# Altium PCB PCB_Autolog.PcbDoc (part 1 of 2)
Units mil, origin at the board's own origin, x right, y up, seen from the top; angles counter-clockwise.
Board outline 3847.36 x 2641.73 mil, 2 copper layers (Top Layer, Bottom Layer); 80 components, 62 nets, 278 pads, 180 vias.
Unrouted connection lines stored in the file: 64.
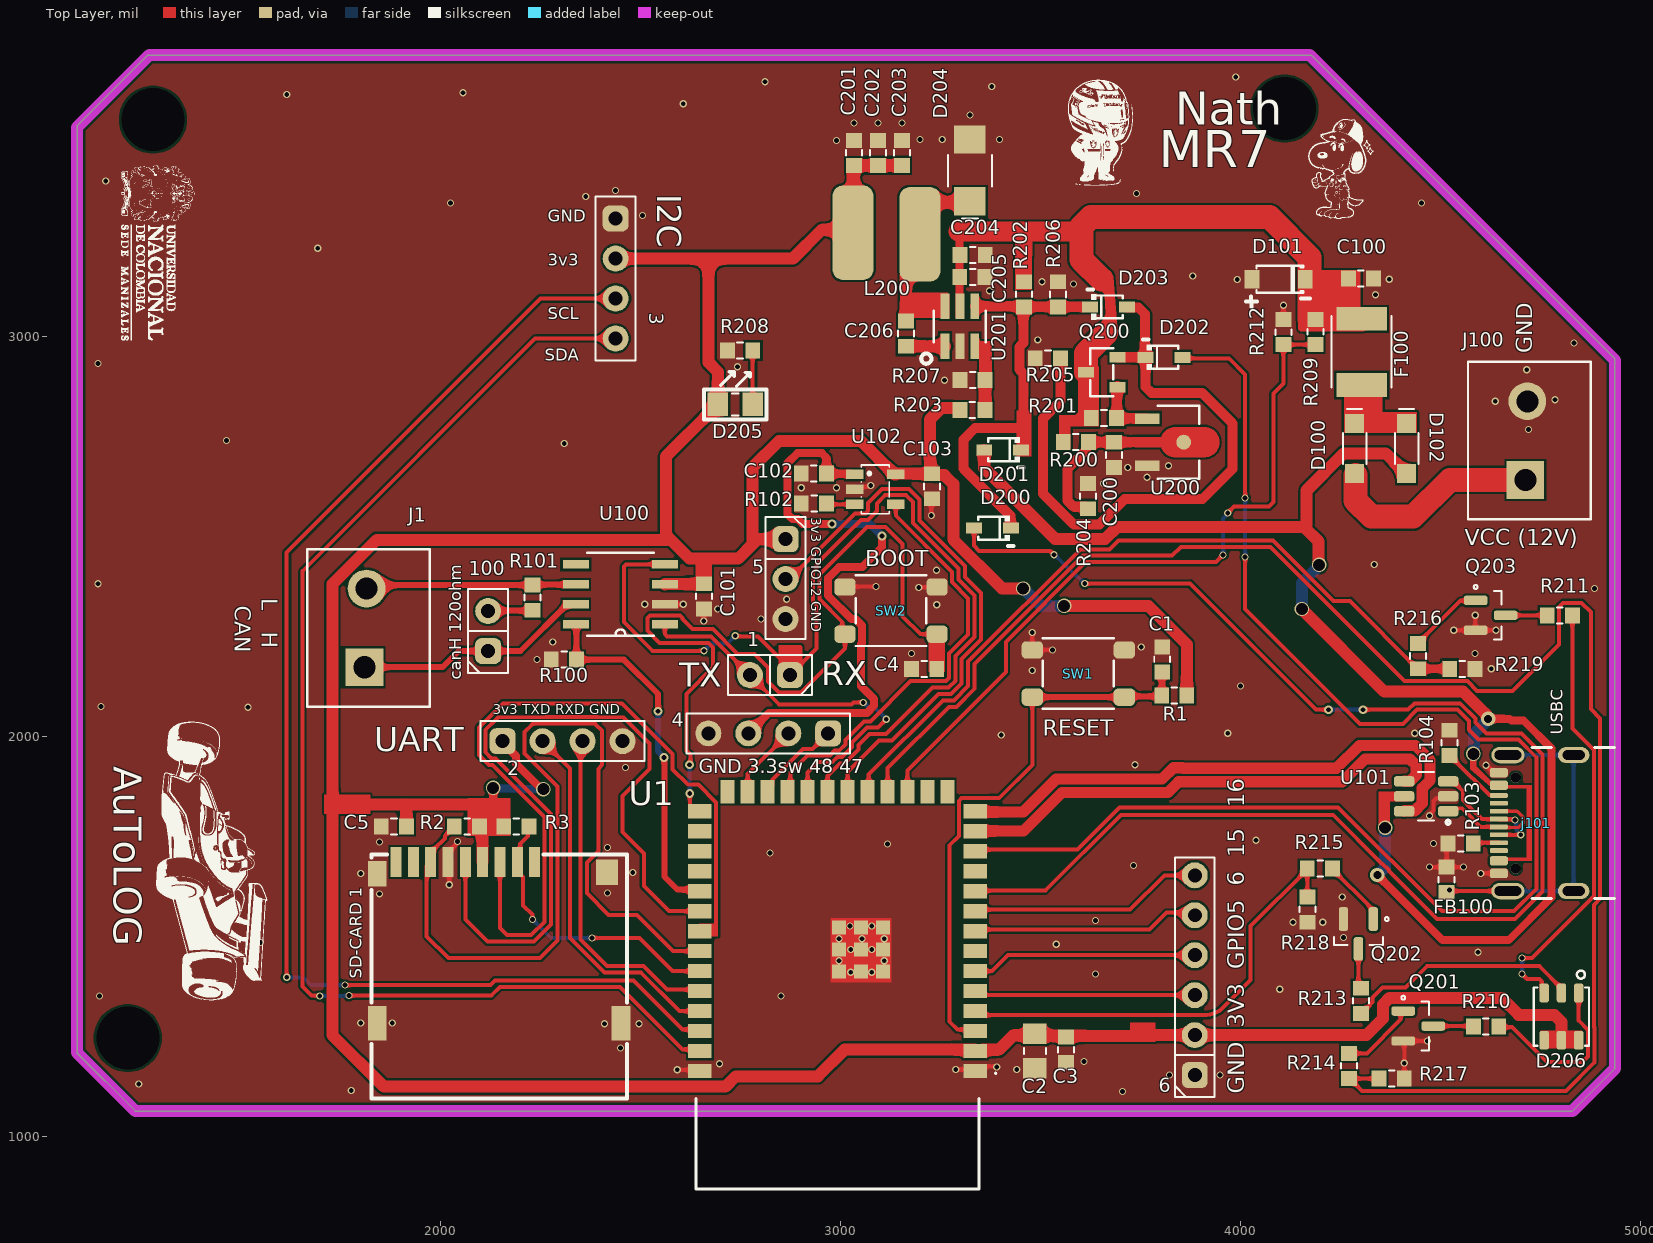
[diagram p0: Top Layer view]
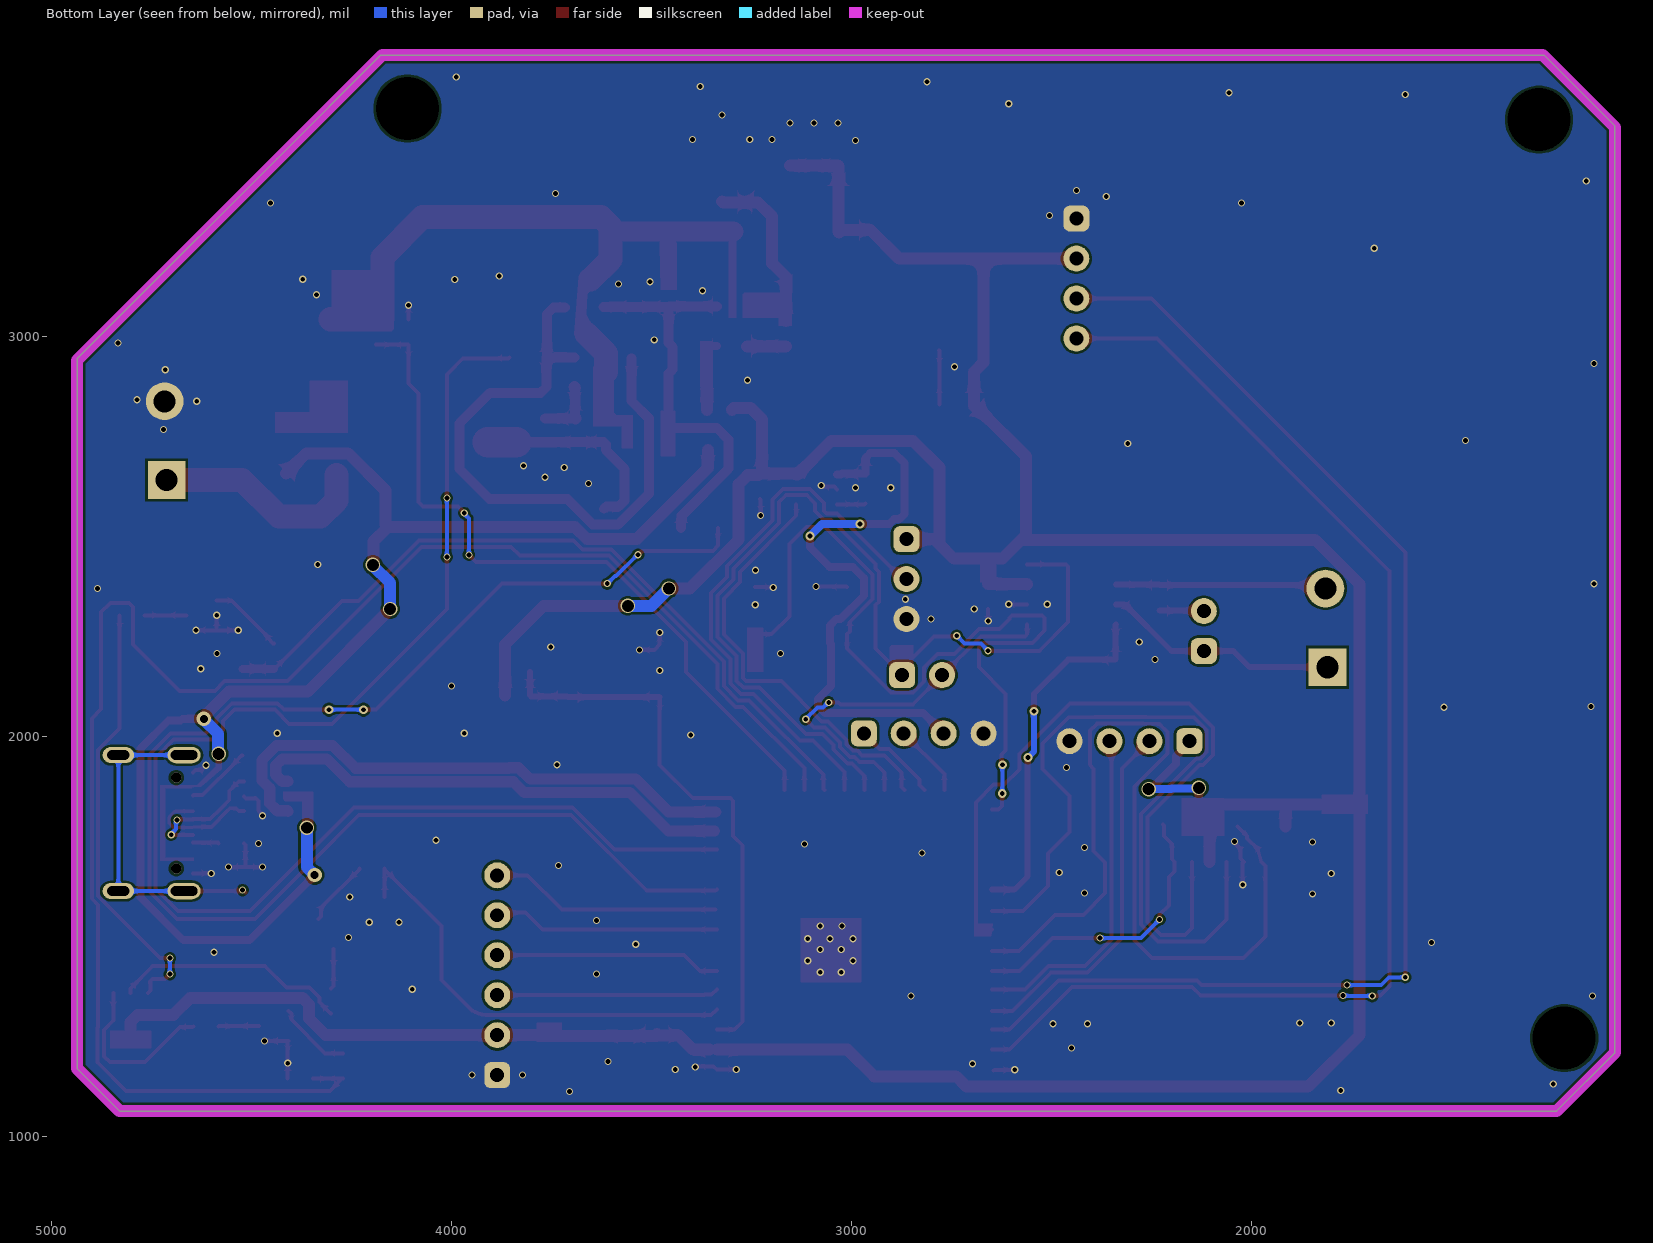
[diagram p1: Bottom Layer view, seen from below]
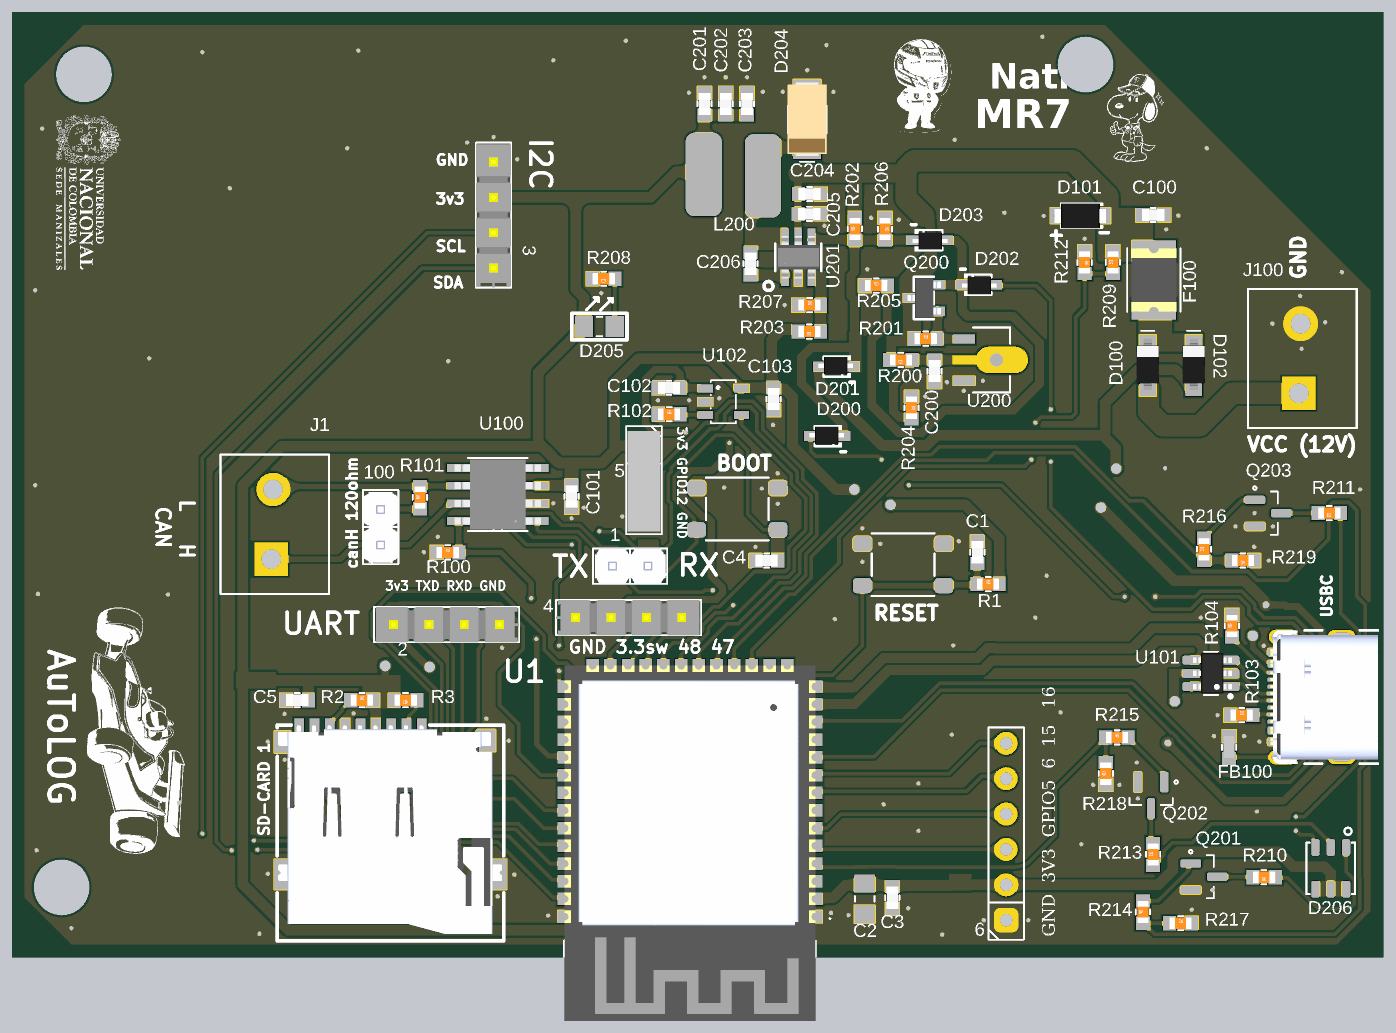
[diagram p3: 3D render of the assembled board from above, using the file's embedded part models]

## Layer stack, top to bottom
Top Solder: solder mask 0.4, Solder Resist, Dk 3.5
Top Layer: signal copper 1.4
Dielectric 1: dielectric 12.6, FR-4, Dk 4.8
Bottom Layer: signal copper 1.4
Bottom Solder: solder mask 0.4, Solder Resist, Dk 3.5

## Board outline
1089.65,1209.01 1235.67,1062.99 4830.71,1062.99 4937.01,1169.29 4937.01,2944.88 4826.77,3055.12 4437.01,3444.88 4177.17,3704.72 1266.95,3704.72 1089.65,3527.42

## Design rules (kind name [scope] priority, off if disabled: settings)
Clearance Clearance_1 [All] p1: gap=6 ignorepadtopadclearanceinfootprint=FALSE
Clearance Clearance_Vias [isvia] p2: gap=0 ignorepadtopadclearanceinfootprint=FALSE
DiffPairsRouting [All] p1: maxlimit=6 minlimit=6 mostfreqgap=6 toplayer_minwidth=10 toplayer_maxwidth=28 toplayer_prefwidth=28 bottomlayer_minwidth=10 bottomlayer_maxwidth=28 bottomlayer_prefwidth=28 maxuncoupledlength=500
HoleSize [All] p1: absolutevalues=TRUE maxlimit=200 minlimit=12 maxpercent=80.000 minpercent=20.000
MinimumAnnularRing [All] p1: minimumring=3
MinimumSolderMaskSliver [All] p1: minsoldermaskwidth=4
PlaneConnect [All] p1: planeconnectstyle=Direct reliefexpansion=20 reliefentries=4 reliefconductorwidth=10 reliefairgap=10
PolygonConnect [All] p1: connectstyle=Direct reliefconductorwidth=8 reliefentries=4 polygonreliefangle="90 Angle" airgapwidth=6
RoutingVias [All] p1: holewidth=12 width=22 viastyle="Through Hole" minholewidth=12 minwidth=18 maxholewidth=30 maxwidth=40
SilkToSilkClearance [All] p1: silktosilkclearance=2
SilkToSolderMaskClearance [IsPad] p1: minsilkscreentomaskgap=0.1 clearancetoexposedcopper=TRUE
SolderMaskExpansion SolderMaskExpansion_via [IsVia] p1: expansion=2 istentingtop=TRUE
SolderMaskExpansion [All] p2: expansion=2 istentingtop=FALSE
SupplyNets "Schematic Supply Nets_2" [InNet('3V3')] p1: voltage=0.000
SupplyNets "Schematic Supply Nets_1" [InNet('VCC')] p2: voltage=0.000
SupplyNets "Schematic Supply Nets" [InNet('GND')] p3: voltage=0.000
Width "Width3V3 o 5V" [InNet('3V3') OR InNet('VBUSS')] p1: maxlimit=30 minlimit=20 preferedwidth=30
Width Width_POWER [InNet('VCC')] p2: maxlimit=60 minlimit=20 preferedwidth=60
Width Width_1 [All] p3: maxlimit=100 minlimit=6 preferedwidth=10 minimp=50.000000 maximp=50.000000 favimp=50.000000
24 further rules are at their usual default settings.

## Classes and differential pairs
differential pair USBC: +USBC_P -USBC_N
differential pair USB_D: +USB_D_P -USB_D_N

## Components (designator, comment, footprint, x,y, rotation, side; value= is the part's Value field where it differs from the comment)
1 "2x1" H_2x1_TH_100mil 2822.83,2153.54 r180 top
2 "4x1" H_4x1_TH_2.54mm 2304.33,1988.19 r0 top
3 "4x1" H_4x1_TH_2.54mm 2437.01,3145.67 r270 top
4 "4x1" H_4x1_TH_2.54mm 2818.9,2007.87 r180 top
5 "3x1" H_3X1_TH_100mil 2862.2,2393.7 r270 top
6 "6x1" H_6x1_TH_100mil 3885.83,1402.76 r90 top
100 "2x1" H_2x1_TH_100mil 2118.11,2263.78 r90 top
C1 "1uF 50V" 0603_cap 3804.49,2192.48 r90 top value=1uF
C2 "22uF 16V" 0805_cap 3486,1212.93 r270 top value=22uF
C3 "0.1uF 50V" 0603_cap 3564.1,1216.54 r270 top value=0.1uF
C4 "0.1uF 50V" 0603_cap 3208.66,2169.29 r0 top value=0.1uF
C5 "10uF 10V" 0603_cap 1882.07,1774.6 r0 top value=10uF
C100 "0.1uF 50V" 0603_cap 4301.65,3145.67 r180 top value=0.1uF
C101 "0.1uF 50V" 0603_cap 2657.48,2350.4 r90 top value=0.1uF
C102 "22uF 10V" 0603_cap 2933.07,2657.48 r180 top value=22uF
C103 "22uF 10V" 0603_cap 3228.35,2625.98 r270 top value=22uF
C200 "1uF 50V" 0603_cap 3683.27,2704.72 r270 top value=1uF
C201 "22uF 10V" 0603_cap 3033.27,3459.72 r90 top value=22uF
C202 "22uF 10V" 0603_cap 3093.27,3459.72 r90 top value=22uF
C203 "22uF 10V" 0603_cap 3153.27,3459.72 r90 top value=22uF
C204 "1uF 50V" 0603_cap 3330,3205 r0 top value=1uF
C205 "1uF 50V" 0603_cap 3329.5,3149 r0 top value=1uF
C206 "0.1uF 50V" 0603_cap 3163.27,3007.72 r90 top value=0.1uF
D100 "40V 1A" SOD_123 4285.9,2720.47 r270 top
D101 "TVS_DIODE_SMF30A" TVS_DIODE_SMF30A 4095.63,3143.89 r180 top
D102 "40V 1A" SOD_123 4415.82,2720.47 r270 top
D200 "1N4148WS" SOD-323_1N4148 3379.9,2521 r180 top
D201 "1N4148WS" SOD-323_1N4148 3405.07,2717.28 r180 top
D202 "1N4148WS" SOD-323_1N4148 3808.85,2948.62 r0 top
D203 "1N4148WS" SOD-323_1N4148 3669.92,3074.72 r0 top
D204 "30V 3A" SMA 3323.27,3416.22 r90 top
D205 "2.9V" 0805_LED 2736.22,2830.71 r0 top
D206 "RGB" RGB_NS_3.5X3.7 4803.15,1299.21 r270 top
F100 "PTC_MF-MSMF110/16-2" FUSER_MF-MSMF110/16-2 4303.21,2962 r270 top
FB100 "60OHM 2A" 0603_fb 4515.75,1641.73 r270 top value="60 OHM"
J1 "CAN" CON_2x1_TH_5MM 1818.9,2271.65 r90 top
J100 "POWER" CON_2x1_TH_5MM 4722.91,2740.16 r90 top
j101 "USB C" CON_USB_C_16P_RA 4740.16,1783.46 r90 top
L200 "10uH 1.42A" Ind_5.8*5.2_NS 3114.61,3258.32 r180 top value=10uH
Q200 "SS8050" "SOT-23-3_TRANS NPN" 3653.27,2911.22 r0 top
Q201 "N CH" SOT_23_3 4444.88,1275.59 r0 top
Q202 "N CH" SOT_23_3 4295.28,1505.91 r270 top
Q203 "N CH" SOT_23_3 4625.98,2303.15 r0 top
R1 "10k 1/10W" 0603_res 3834.49,2102.48 r0 top value=10k
R2 "10k 1/10W" 0603_res 2064.96,1774.6 r0 top value=10k
R3 "10k 1/10W" 0603_res 2188.73,1774.6 r180 top value=10k
R100 "10k 1/10W" 0603_res 2307.48,2192.21 r0 top value=10k
R101 "120R 1/10W" 0603_res 2228.98,2347.21 r90 top value=120R
R102 "10k 1/10W" 0603_res 2933.07,2582.68 r0 top value=10k
R103 "5k1 1/10W" 0603_res 4551.18,1732.28 r0 top value=5k1
R104 "5k1 1/10W" 0603_res 4523.62,1984.25 r90 top value=5k1
R200 "226k 1/10W" 0603_res 3588.27,2736.22 r180 top value=226k
R201 "49k9 1/10W" 0603_res 3658.27,2796.22 r0 top value=49k9
R202 "0R 1/10W" 0603_res 3458.27,3106.22 r90 top value=0R
R203 "33k2 1/10W" 0603_res 3329.77,2816.22 r180 top value=33k2
R204 "73k2 1/10W" 0603_res 3618.27,2601.22 r270 top value=73k2
R205 "10k 1/10W" 0603_res 3518.27,2946.22 r0 top value=10k
R206 "10k 1/10W" 0603_res 3543.27,3106.22 r270 top value=10k
R207 "10k 1/10W" 0603_res 3329.77,2891.22 r0 top value=10k
R208 "84R5 1/10W" 0603_res 2748.65,2965.7 r180 top value=84R5
R209 "49k9 1/10W" 0603_res 4187.48,3011.81 r90 top value=49k9
R210 "120R 1/10W" 0603_res 4614.76,1274.17 r180 top value=120R
R211 "120R 1/10W" 0603_res 4799.21,2303.15 r180 top value=120R
R212 "10k 1/10W" 0603_res 4107.48,3011.81 r270 top value=10k
R213 "100R 1/10W" 0603_res 4301.18,1338.58 r90 top value=100R
R214 "1k 1/10W" 0603_res 4272.24,1175.75 r90 top value=1k
R215 "1k 1/10W" 0603_res 4198.82,1669.29 r0 top value=1k
R216 "1k 1/10W" 0603_res 4444.88,2200.79 r90 top value=1k
R217 "10k 1/10W" 0603_res 4378.54,1144.25 r0 top value=10k
R218 "10k 1/10W" 0603_res 4167.32,1566.93 r90 top value=10k
R219 "10k 1/10W" 0603_res 4555.12,2169.29 r180 top value=10k
"SD-CARD 1" "Micro_SD_socket" "MICROSD CARD SMD" 2145.67,1484.25 r0 top
SW1 "RESET" Sw_PUSH_4.5x4.5x5mm 3594.49,2157.48 r180 top
SW2 "BOOT" Sw_PUSH_4.5x4.5x5mm 3125.98,2314.96 r180 top
U1 "ESP32-S3-WROOM-1-N16R8" ESP32S3WROOM1N8R2 3053.13,1358.02 r0 top
U100 "CAN Transceiver" D8-M 2448.98,2355.71 r180 top
U101 "USBLC6-2SC6" SOT_23_6 4464.57,1850.39 r180 top
U102 "MT9700" SOT-23-5_L3.0-W1.7-P0.95-LS2.8-BR 3086.61,2618.11 r180 top
U200 "HT7033A-1_sensadoV" SOT-89-3_L4.5-W2.5-P1.50-LS4.2-BR 3820.23,2736.21 r180 top
U201 "LMR14006 Buck 40V 600mA" DDC6_TEX-M 3298.27,3026.22 r90 top

## Footprints (in the part's own frame and the unit in brackets; to place one, negate y for a bottom-side part, rotate by r counter-clockwise, add the part's x,y. Pads: shape width x height; smd on the part's side, far side on the other; paste and mask are expansions set on the pad)
0603_cap [mil]
  rect 37x40 smd: 1(-31.5,0) 2(31.5,0)
  silkscreen extent -7,-20 8,20, body extent -31,-17 31,17, height 34
0603_fb [mil]
  rect 37x40 smd: 1(-31.5,0) 2(31.5,0)
  silkscreen extent -7,-20 8,20, body extent -32,-16 31,16, height 32
0603_res [mil] "1608 Metric / 20190225 / C-A.Serna.A"
  rect 37x40 smd: 1(-31.5,0) 2(31.5,0)
  silkscreen extent -6,-20 8,20, body extent -31,-16 32,16, height 12
0805_cap [mm]
  rect 1.3x1.5 smd: 1(-1.1,0) 2(1.1,0)
  silkscreen extent -0.2,-0.7 0.2,0.7, body extent -1.13,-0.7 1.07,0.7, height 1
0805_LED [mm]
  rect 1.3x1.5 smd: 1(-1.1,0) 2(1.1,0)
  silkscreen extent -1.98,-0.97 1.98,2.07, body extent -1,-0.62 1,0.63, height 1.1
CON_2x1_TH_5MM [mm]
  rect 2.4x2.4 hole 1.4: 1(-2.5,0.254)
  round 2.4 hole 1.4: 2(2.5,0.127)
  silkscreen extent -5,-3.9 5,3.9, body extent -5,-3.9 5,3.9, height 10.2
CON_USB_C_16P_RA [mm]
  oval 1x2 hole 0.6 slot 1.4 at 90 deg: 0(-4.32,-2.377) 0(4.32,-2.377)
  oval 1.05x2.1 hole 0.6 slot 1.7 at 90 deg: 0(-4.32,1.803) 0(4.32,1.803)
  rrect50% 0.6x1.15 smd mask+0.047: A1/B12(-3.2,2.378) A4/B9(-2.4,2.378) B1/A12(3.2,2.378) B4/A9(2.4,2.378)
  rrect50% 0.3x1.15 smd mask+0.047: A5(-1.25,2.378) A6(-0.25,2.378) A7(0.25,2.378) A8(1.25,2.378) B5(1.75,2.378) B6(0.75,2.378) B7(-0.75,2.378) B8(-1.75,2.378)
  round 0.65 hole 0.65 unplated mask+0.025: ""(-2.89,1.303) ""(2.89,1.303)
  silkscreen extent -4.79,-4.98 4.79,0.27, body extent -4.79,-4.98 4.79,2.73, height 3.31
D8-M [mil]
  rect 65.5x22 smd paste+0: 1(-111.25,75) 2(-111.25,25) 3(-111.25,-25) 4(-111.25,-75) 5(111.25,-75) 6(111.25,-25) 7(111.25,25) 8(111.25,75)
  silkscreen extent -84,-104 84,104, body extent -122,-99 122,99, height 69
DDC6_TEX-M [mm]
  rect 1.61x0.558 smd paste+0: 1(-1.269,0.95) 2(-1.269,0) 3(-1.269,-0.95) 4(1.269,-0.95) 5(1.269,0) 6(1.269,0.95)
  silkscreen extent -2.38,-1.65 1,2.46, body extent -1.52,-1.52 1.52,1.52, height 1.7
ESP32S3WROOM1N8R2 [mm]
  rect 1.5x0.9 smd: 1(7.201,-4.955) 2(7.201,-3.685) 3(7.201,-2.415) 4(7.201,-1.145) 5(7.201,0.125) 6(7.201,1.395) 7(7.201,2.665) 8(7.201,3.935) 9(7.201,5.205) 10(7.201,6.475) 11(7.201,7.745) 12(7.201,9.015) 13(7.201,10.285) 14(7.201,11.555) 27(-10.299,11.555) 28(-10.299,10.285) 29(-10.299,9.015) 30(-10.299,7.745) 31(-10.299,6.475) 32(-10.299,5.205) 33(-10.299,3.935) 34(-10.299,2.665) 35(-10.299,1.395) 36(-10.299,0.125) 37(-10.299,-1.145) 38(-10.299,-2.415) 39(-10.299,-3.685) 40(-10.299,-4.955)
  rect 0.9x1.5 smd: 15(5.436,12.805) 16(4.166,12.805) 17(2.896,12.805) 18(1.626,12.805) 19(0.356,12.805) 20(-0.914,12.805) 21(-2.184,12.805) 22(-3.454,12.805) 23(-4.724,12.805) 24(-5.994,12.805) 25(-7.264,12.805) 26(-8.534,12.805)
  rect 0.9x0.9 smd: 41(-0.049,2.765) 42(-0.049,1.365) 43(1.351,1.365) 44(1.351,2.765) 45(1.351,4.165) 46(-0.049,4.165) 47(-1.449,4.165) 48(-1.449,2.765) 49(-1.449,1.365)
  silkscreen extent -10.55,-12.45 8.55,-5.05, body extent -10.55,-12.45 7.45,13.05, height 3.25
FUSER_MF-MSMF110/16-2 [mm]
  rect 1.5x3.2 smd: 1(-2.1,0) 2(2.1,0)
  silkscreen extent -2.27,-1.91 2.27,1.91, body extent -2.27,-1.62 2.27,1.62, height 0.85
H_2x1_TH_100mil [mil]
  rrect50% 65x65 hole 35: 1(-50,0)
  round 65 hole 35: 2(50,0)
  silkscreen extent -105,-50 105,50, body extent -101,-49 99,49, height 339
H_3X1_TH_100mil [mil]
  rrect50% 65x65 hole 35: 1(-100,0)
  round 65 hole 35: 2(0,0) 3(100,0)
  silkscreen extent -155,-50 150,50, body extent -142,-46 142,46, height 320
H_4x1_TH_2.54mm [mil]
  rrect50% 65x65 hole 35: 1(-150,0)
  round 65 hole 35: 2(-50,0) 3(50,0) 4(150,0)
  silkscreen extent -205,-50 205,50, body extent -200,-50 205,50, height 420
H_6x1_TH_100mil [mil]
  rrect50% 65x65 hole 35: 1(-250,0)
  round 65 hole 35: 2(-150,0) 3(-50,0) 4(50,0) 5(150,0) 6(250,0)
  silkscreen extent -305,-50 295,50
Ind_5.8*5.2_NS [mm]
  rrect50% 2.6x6 smd: 1(-2.125,0.053) 2(2.125,-0.053)
  body extent -3,-2.75 3,2.75, height 4.5
"MICROSD CARD SMD" [mm]
  rect 0.7x1.9 smd: 1(2.25,5.125) 2(1.15,5.125) 3(0.05,5.125) 4(-1.05,5.125) 5(-2.15,5.125) 6(-3.25,5.125) 7(-4.35,5.125) 8(-5.45,5.125) 9(-6.55,5.125)
  rect 1.2x1.6 smd: 10(-7.75,4.375)
  rect 1.2x2.2 smd: 11(-7.75,-5.125) 12(7.75,-5.125)
  rect 1.4x1.6 smd: 13(6.85,4.475)
  silkscreen extent -8.13,-9.91 8.13,5.59, body extent -8.08,-9.41 8.02,5.6, height 1.9
RGB_NS_3.5X3.7 [mm]
  rrect50% 1.2x0.6 smd: 1(-1.5,1.1) 2(-1.5,0) 3(-1.5,-1.1) 4(1.5,-1.1) 5(1.5,0) 6(1.5,1.1)
  silkscreen extent -2.92,-1.75 1.85,1.75, body extent -1.85,-1.74 1.85,1.75, height 1
SMA [mm]
  rect 1.8x2 smd: 1(-1.965,0) 2(1.965,0)
  silkscreen extent -3.05,-1.4 0.98,1.4, body extent -2.64,-1.4 2.64,1.4, height 2.34
SOD-323_1N4148 [mm]
  rect 1x0.7 smd: 1(-1.172,0) 2(1.172,0)
  silkscreen extent -1.32,-0.8 0.9,1.12, body extent -1.22,-0.69 1.28,0.56, height 1.1
SOD_123 [mm]
  rect 1.2x1.2 smd: 1(-1.6,0) 2(1.6,0)
  silkscreen extent -2.5,-0.75 1,0.75, body extent -1.93,-0.8 1.77,0.8, height 1.28
"SOT-23-3_TRANS NPN" [mm]
  rect 1x0.65 smd: 1(1,-0.95) 2(1,0.95) 3(-1,0)
  silkscreen extent -0.73,-1.53 0.73,1.53, body extent -1.17,-1.45 1.23,1.45, height 1.11
SOT-23-5_L3.0-W1.7-P0.95-LS2.8-BR [mm]
  rect 1.1x0.6 smd: 1(1.3,-0.95) 2(1.3,0) 3(1.3,0.95) 4(-1.3,0.95) 5(-1.3,-0.95)
  silkscreen extent -0.9,-1.55 0.9,1.55, body extent -0.93,-1.5 0.88,1.55, height 1
SOT-89-3_L4.5-W2.5-P1.50-LS4.2-BR [mm]
  rect 1.575x0.672 smd paste+0 mask+0.051: 1(1.356,-1.5) 3(1.356,1.5)
  round 0.95 smd: 2(-0.966,0)
  Top Layer region: -2.283,0.95 -0.429,0.95 -0.384,0.949 -0.34,0.946 -0.296,0.94 -0.252,0.933 -0.208,0.924 -0.165,0.912 -0.123,0.899 -0.081,0.884 -0.04,0.866 0,0.847 0.04,0.826 0.078,0.803 0.115,0.779 0.151,0.752 0.185,0.724 0.219,0.695 0.251,0.664 0.281,0.631 0.31,0.597 0.337,0.562 0.362,0.525 0.386,0.488 0.408,0.449 0.428,0.409 0.447,0.33 2.144,0.33 2.144,-0.33 0.447,-0.33 0.428,-0.409 0.408,-0.449 0.386,-0.488 0.362,-0.526 0.337,-0.562 0.31,-0.597 0.281,-0.631 0.251,-0.664 0.219,-0.695 0.185,-0.725 0.151,-0.753 0.115,-0.779 0.078,-0.804 0.04,-0.827 0,-0.848 -0.04,-0.867 -0.081,-0.884 -0.123,-0.899 -0.165,-0.913 -0.208,-0.924 -0.252,-0.934 -0.296,-0.941 -0.34,-0.946 -0.384,-0.949 -0.429,-0.95 -2.283,-0.95 -2.328,-0.949 -2.372,-0.946 -2.416,-0.941 -2.46,-0.934 -2.504,-0.924 -2.547,-0.913 -2.589,-0.899 -2.631,-0.884 -2.672,-0.867 -2.713,-0.848 -2.752,-0.827 -2.79,-0.804 -2.827,-0.779 -2.863,-0.753 -2.898,-0.725 -2.931,-0.695 -2.963,-0.664 -2.993,-0.631 -3.022,-0.597 -3.049,-0.562 -3.075,-0.526 -3.098,-0.488 -3.12,-0.449 -3.141,-0.409 -3.159,-0.369 -3.175,-0.327 -3.189,-0.285 -3.202,-0.242 -3.212,-0.199 -3.22,-0.155 -3.227,-0.111 -3.231,-0.067 -3.233,-0.022 -3.233,0.022 -3.231,0.067 -3.227,0.111 -3.22,0.155 -3.212,0.199 -3.202,0.242 -3.189,0.285 -3.175,0.327 -3.159,0.369 -3.141,0.409 -3.12,0.449 -3.098,0.488 -3.075,0.525 -3.049,0.562 -3.022,0.597 -2.993,0.631 -2.963,0.664 -2.931,0.695 -2.898,0.724 -2.863,0.752 -2.827,0.779 -2.79,0.803 -2.752,0.826 -2.713,0.847 -2.672,0.866 -2.631,0.884 -2.589,0.899 -2.547,0.912 -2.504,0.924 -2.46,0.933 -2.416,0.94 -2.372,0.946 -2.328,0.949 -2.283,0.95
  silkscreen extent -1.95,-2.33 0.7,2.33, body extent -1.94,-2.34 1.09,2.34, height 1
SOT_23_3 [mm]
  rrect50% 1.5x0.6 smd: 1(-0.95,0.95) 2(-0.95,-0.95) 3(0.95,0)
  silkscreen extent -1.07,-1.55 0.7,1.92, body extent -0.7,-1.52 0.7,1.53, height 1.12
SOT_23_6 [mm]
  rrect50% 1.3x0.65 smd: 1(-1.4,0.95) 2(-1.4,0) 3(-1.4,-0.95) 4(1.4,-0.95) 5(1.4,0) 6(1.4,0.95)
  silkscreen extent -1.52,-1.55 0.5,1.78, body extent -1.5,-1.45 1.3,1.45, height 1.45
Sw_PUSH_4.5x4.5x5mm [mm]
  rrect50% 1.35x1.1 smd: 1(-2.925,1.5) 1(2.925,1.5) 2(-2.925,-1.5) 2(2.925,-1.5)
  silkscreen extent -2.25,-2.25 2.25,2.25, body extent -2.25,-2.25 2.25,2.25, height 5
TVS_DIODE_SMF30A [mm]
  rect 0.95x1.15 smd: 1(-1.692,0) 2(1.692,0)
  silkscreen extent -2.01,-0.87 2.08,1.78, body extent -1.85,-0.89 1.85,0.91, height 1.55

## Part data
1 100: library part H_Male_2x1_TH_100mil, "H_Male_2x1_TH_100mil", ComponentLink1Description=LCSC
2 3 4: library part H_Male_4x1_TH_100mil, "H_Male_4x1_TH_100mil", ComponentLink1Description=LCSC
5: library part H_Male_3x1_TH_100mil, "H_Male_3x1_TH_100mil", ComponentLink1Description=LCSC
6: library part H_Male_6x1_TH_100mil, "H_Male_6x1_TH_100mil", ComponentLink1Description=LCSC
C1 C200 C204 C205: library part Cap_1uF_0603_50V, "50V 1uF X5R ±10% 0603 Multilayer Ceramic Capacitors MLCC - SMD/SMT ROHS", Manufacturer="Samsung Electro-Mechanics", Manufacturer Part Number=CL10A105KB8NNNC, Supplier Part Number 1=C15849, ComponentLink1Description=LCSC, ComponentLink1URL=https://www.lcsc.com/product-detail/Multilayer-Ceramic-Capacitors-MLCC-SMD-SMT_Samsung-Electro-Mechanics-CL10A105KB8NNNC_C15849.html, Supplier 1=LCSC
  C1 C200: ComponentLink2Description=Datashhet, ComponentLink2URL=https://www.lcsc.com/datasheet/C15849.pdf
C2: library part Cap_22uF_0805_16V, "16V 22uF X5R ±20% 0805 Multilayer Ceramic Capacitors MLCC - SMD/SMT ROHS", Manufacturer=Chinocera, Manufacturer Part Number=HGC0805R5226M160NSLJ, Supplier Part Number 1=C33546008, ComponentLink1Description=LCSC, ComponentLink1URL=https://lcsc.com/product-detail/Multilayer-Ceramic-Capacitors-MLCC-SMD-SMT_Chinocera-HGC0805R5226M160NSLJ_C33546008.html, Supplier 1=LCSC
C3 C4 C100 C101 C206: library part Cap_0.1uF_0603_50V, "50V 100nF Y5V -20%~+80% 0603 Multilayer Ceramic Capacitors MLCC - SMD/SMT ROHS", Manufacturer="Walsin Tech Corp", Manufacturer Part Number=0603F104Z500CT, Supplier Part Number 1=C83060, ComponentLink1Description=LCSC, ComponentLink1URL=https://www.lcsc.com/product-detail/Multilayer-Ceramic-Capacitors-MLCC-SMD-SMT_Walsin-Tech-Corp-0603F104Z500CT_C83060.html, Supplier 1=LCSC
  C3 C100 C101 C206: ComponentLink2Description=Datasheet, ComponentLink2URL=https://www.lcsc.com/datasheet/C83060.pdf
C5: library part Cap_10uF_0603_10V, "10V 10uF X5R ±10% 0603 Multilayer Ceramic Capacitors MLCC - SMD/SMT ROHS", Manufacturer=CCTC, Manufacturer Part Number=TCC0603X5R106K100CT, Supplier Part Number 1=C380314, ComponentLink1Description=LCSC, ComponentLink1URL=https://www.lcsc.com/product-detail/Multilayer-Ceramic-Capacitors-MLCC-SMD-SMT_CCTC-TCC0603X5R106K100CT_C380314.html, Supplier 1=LCSC
C102 C103 C201 C202 C203: library part Cap_22uF_0603_10V, "10V 22uF X5R ±20% 0603 Multilayer Ceramic Capacitors MLCC - SMD/SMT ROHS", Manufacturer=HRE, Manufacturer Part Number=CGA0603X5R226M100JT, Supplier Part Number 1=C6119863, ComponentLink1Description=LCSC, ComponentLink1URL=https://lcsc.com/product-detail/Multilayer-Ceramic-Capacitors-MLCC-SMD-SMT_HRE-CGA0603X5R226M100JT_C6119863.html, ComponentLink2Description=Datasheet, ComponentLink2URL=https://www.lcsc.com/datasheet/C6119863.pdf, Supplier 1=LCSC
D100 D102: library part D_Schottky_40V_1A_SOD_123F, "DIODE SCHOTTKY 40V 1A SOD123F", Manufacturer="Shanghai Prisemi Elec", Manufacturer Part Number=PSBD1DF40V1H, Supplier Part Number 1=C110730, ComponentLink1Description=LCSC, ComponentLink1URL=https://www.lcsc.com/product-detail/Switching-Diode_Shanghai-Prisemi-Elec-PSBD1DF40V1H_C110730.html, ComponentLink2Description=Datasheet, ComponentLink2URL=https://www.lcsc.com/datasheet/C110730.pdf, Supplier 1=LCSC
D101: "TVS DIODE 30VWM 48.4VC SOD123F", Manufacturer="Diotec Semiconductor", Manufacturer Part Number=SMF30A, Supplier Part Number 1=4878-SMF30ATR-ND, ComponentLink1Description=digikey, ComponentLink1URL=https://www.digikey.com/en/products/detail/diotec-semiconductor/SMF30A/13164473, ComponentLink2Description=Datasheet, ComponentLink2URL=https://diotec.com/request/datasheet/smf50a.pdf, Supplier 1=digikey
D200 D201 D202 D203: library part 1N4148WS_DIODE, "DIODE GP 100V 150mA SOD-323", Manufacturer=JSCJ, Supplier Part Number 1=C2128, ComponentLink1Description=JSCJ, ComponentLink1URL=https://www.lcsc.com/product-detail/Switching-Diode_JCET-1N4148WS_C2128.html, ComponentLink2Description=Datasheet, ComponentLink2URL=https://www.lcsc.com/datasheet/C2128.pdf, Manufacturer Part Number=1N4148WS, Supplier 1=LCSC
D204: library part D_Schottky_40V_3A_SMA, "40V Independent 3A 550mV@3A SMA Schottky Diodes ROHS", Manufacturer=TDSEMIC, Manufacturer Part Number=SS34-TD, Supplier Part Number 1=C46550832, ComponentLink1Description=LCSC, ComponentLink1URL=https://lcsc.com/product-detail/Schottky-Diodes_TDSEMIC-SS34-TD_C46550832.html, ComponentLink2Description=Datasheet, ComponentLink2URL=https://www.lcsc.com/datasheet/C46550832.pdf, ComponentLink3Description="New link", Supplier 1=LCSC
D205: library part LED_0805_Green, "LED GREEN CLEAR 0805 SMD", Manufacturer=XINGLIGHT, Manufacturer Part Number=XL-2012UGC, Supplier Part Number 1=C965815, ComponentLink1Description=LCSC, ComponentLink1URL=https://www.lcsc.com/product-detail/Light-Emitting-Diodes-LED_XINGLIGHT-XL-2012UGC_C965815.html, Supplier 1=LCSC
D206: library part LED_RGB_3535_SMD, "-30℃~+85℃ RGB 110° 3535(mm) Light Emitting Diodes (LED) ROHS", Manufacturer="Foshan NationStar Optoelectronics", Manufacturer Part Number=RS-3535MWAM, Supplier Part Number 1=C842778, ComponentLink1Description=LCSC, ComponentLink1URL=https://www.lcsc.com/product-detail/Light-Emitting-Diodes-LED_Foshan-NationStar-Optoelectronics-RS-3535MWAM_C842778.html, Supplier 1=LCSC
F100: "Polymeric PTC Resettable Fuse 16V 1.1 A Ih Surface Mount 1812 (4532 Metric), Concave", Manufacturer="Bourns Inc.", Manufacturer Part Number=MF-MSMF110/16-2, Supplier Part Number 1=MF-MSMF110/16-2TR-ND, ComponentLink1Description=digikey, ComponentLink1URL=https://www.digikey.com/en/products/detail/bourns-inc/MF-MSMF110-16-2/662820?s=N4IgTCBcDaIEIHkCqAlAcgZQAQFkBiAtDhvgIykAMA9KQGwEQC6AvkA, ComponentLink2Description=Datasheet, ComponentLink2URL=https://www.bourns.com/docs/product-datasheets/mf-msmf.pdf, Supplier 1=digikey
FB100: library part FB_60_0603_2A, "2A 1 100mΩ 60Ω@100MHz ±25% 0603 Ferrite Beads ROHS", Manufacturer=TAI-TECH, Manufacturer Part Number=HCB1608KF-600T20, Supplier Part Number 1=C369516, ComponentLink1Description=LCSC, ComponentLink1URL=https://www.lcsc.com/product-detail/Ferrite-Beads_TAI-TECH-HCB1608KF-600T20_C369516.html, Supplier 1=LCSC
J1 J100: library part Con_2x1_TH_5mm, "2POS 5MM", Manufacturer=JILN, Manufacturer Part Number=JL126-50002G01, Supplier Part Number 1=C394556, ComponentLink1Description=LCSC, ComponentLink1URL=https://www.lcsc.com/product-detail/Screw-terminal_JILN-JL126-50002G01_C394556.html, ComponentLink2Description=Datasheet, ComponentLink2URL=https://www.lcsc.com/datasheet/C394556.pdf, Supplier 1=LCSC
j101: library part CON_USB_TYPEC_16P, "3A USB 3.1 1 Surface Mount 16P Female -40℃~+85℃ Type-C SMD USB Connectors ROHS", Manufacturer="SHOU HAN", Manufacturer Part Number=TYPE-C-3.1-16PIN, Supplier Part Number 1=C7507405, ComponentLink1Description=LCSC, ComponentLink1URL=https://lcsc.com/product-detail/USB-Connectors_SHOU-HAN-TYPE-C-3-1-16PIN_C7507405.html, ComponentLink2Description=Datasheet, Supplier 1=LCSC
L200: library part Inductor_10uH_1.42A_5.8*5.2mm, "1.42A 10uH ±10% 87.9mΩ SMD,5.8x5.2mm Inductors (SMD) ROHS", Manufacturer="SHOU HAN", Manufacturer Part Number=CY54-10UH, Supplier Part Number 1=C2929431, ComponentLink1Description=LCSC, ComponentLink1URL=https://lcsc.com/product-detail/Inductors-SMD_SHOU-HAN-CY54-4-7UH_C2929429.html, ComponentLink2Description=Datasheet, ComponentLink2URL=https://www.lcsc.com/datasheet/C2929429.pdf, Supplier 1=LCSC
Q200: library part TRANS_NPN_SS8050_SOT23, "SS8050 Transistor BJT NPN 40V 1.5A", Manufacturer=JSCJ, Manufacturer Part Number=SS8050(RANGE:200-350), Supplier Part Number 1=C2150, ComponentLink1Description=LCSC, ComponentLink1URL=https://www.lcsc.com/product-detail/Bipolar-Transistors-BJT_JCET-SS8050_C2150.html, ComponentLink2Description=Datasheet, ComponentLink2URL=https://www.lcsc.com/datasheet/C2150.pdf, Supplier 1=LCSC
Q201 Q202 Q203: library part Q_NFET_20V_3.2A_SOT23, "MOSFET N-CH 20V SOT23", Manufacturer=Doeshare, Manufacturer Part Number=DN2302S, Supplier Part Number 1=C2931750, ComponentLink1Description=LCSC, ComponentLink1URL=https://www.lcsc.com/product-detail/MOSFETs_Doeshare-DN2302S_C2931750.html, Supplier 1=LCSC
R1 R2 R3 R100 R102 R205 R206 R207 R212 R217 R218 R219: library part Res_10k_0603_1/10W, "RES SMD 10k OHM 5% 1/10W 0603", Manufacturer=FOJAN, Manufacturer Part Number=FRC0603J103TS, Supplier Part Number 1=C2930027, ComponentLink1Description=LCSC, ComponentLink1URL=https://www.lcsc.com/product-detail/Chip-Resistor-Surface-Mount_FOJAN-FRC0603J103TS_C2930027.html, ComponentLink2Description=Datasheet, ComponentLink2URL=https://www.lcsc.com/datasheet/C2930027.pdf, Supplier 1=LCSC
R101 R210 R211: library part Res_120R_0603_1/10W, "100mW Thick Film Resistor 75V ±100ppm/℃ ±1% 120Ω 0603 Chip Resistor - Surface Mount ROHS", Manufacturer=FOJAN, Manufacturer Part Number=FRC0603F1200TS, Supplier Part Number 1=C2906988, ComponentLink1Description=LCSC, ComponentLink1URL=https://lcsc.com/product-detail/Chip-Resistor-Surface-Mount_FOJAN-FRC0603F1200TS_C2906988.html, ComponentLink2Description=Datasheet, ComponentLink2URL=https://www.lcsc.com/datasheet/C2906988.pdf, Supplier 1=LCSC
R103 R104: library part Res_5k1_0603, "RES 5.1kΩ ±1% 100mW 0603", Manufacturer=YAGEO, Manufacturer Part Number=RC0603FR-0773K2L, Supplier Part Number 1=C163420, ComponentLink1Description=LCSC, ComponentLink1URL=https://www.lcsc.com/product-detail/Chip-Resistor-Surface-Mount_UNI-ROYAL-Uniroyal-Elec-0603W8F5101T5E_C23186.html, Supplier 1=LCSC
R200: library part Res_226k_0603_1/10W, "100mW Thick Film Resistors 75V ±100ppm/℃ ±1% 226kΩ 0603 Chip Resistor - Surface Mount ROHS", Manufacturer=YAGEO, Manufacturer Part Number=RC0603FR-07226KL, Supplier Part Number 1=C165744, ComponentLink1Description=LCSC, ComponentLink1URL=https://lcsc.com/product-detail/Chip-Resistor-Surface-Mount_YAGEO-RC0603FR-07226KL_C165744.html, Supplier 1=LCSC
R201 R209: library part Res_49k9_0603_1/10W, "100mW Thick Film Resistor 75V ±100ppm/℃ ±1% 49.9kΩ 0603 Chip Resistor - Surface Mount ROHS", Manufacturer=YAGEO, Manufacturer Part Number=RC0603FR-0749K9L, Supplier Part Number 1=C114624, ComponentLink1Description=LCSC, ComponentLink1URL=https://lcsc.com/product-detail/Chip-Resistor-Surface-Mount_YAGEO-RC0603FR-0749K9L_C114624.html, Supplier 1=LCSC
R202: library part Res_0R_0603_1/10W, "RES SMD 0R OHM 5% 1/10W 0603", Manufacturer=FOJAN, Manufacturer Part Number="FRC0603P000 TS", Supplier Part Number 1=C2907080, ComponentLink1Description=LCSC, ComponentLink1URL=https://www.lcsc.com/product-detail/Chip-Resistor-Surface-Mount_FOJAN-FRC0603P000-TS_C2907080.html, ComponentLink2Description=Datasheet, ComponentLink2URL=https://www.lcsc.com/datasheet/C2907080.pdf, Supplier 1=LCSC
R203: library part Res_33k2_0603_1/10W, "100mW Thick Film Resistor 75V ±100ppm/℃ ±1% 33.2kΩ 0603 Chip Resistor - Surface Mount ROHS", Manufacturer=YAGEO, Manufacturer Part Number=RC0603FR-0733K2L, Supplier Part Number 1=C185338, ComponentLink1Description=LCSC, ComponentLink1URL=https://lcsc.com/product-detail/Chip-Resistor-Surface-Mount_YAGEO-RC0603FR-0733K2L_C185338.html, ComponentLink2Description=Datasheet, ComponentLink2URL=https://www.lcsc.com/datasheet/C185338.pdf, Supplier 1=LCSC
R204: library part Res_73k2_0603_1/10W, "100mW Thick Film Resistor 75V ±100ppm/℃ ±1% 73.2kΩ 0603 Chip Resistor - Surface Mount ROHS", Manufacturer=YAGEO, Manufacturer Part Number=RC0603FR-0773K2L, Supplier Part Number 1=C163420, ComponentLink1Description=LCSC, ComponentLink1URL=https://lcsc.com/product-detail/Chip-Resistor-Surface-Mount_YAGEO-RC0603FR-0773K2L_C163420.html, Supplier 1=LCSC
R208: library part Res_84R5_0603_1/10W, "100mW Thick Film Resistor 50V ±100ppm/℃ ±1% 84.5Ω 0603 Chip Resistor - Surface Mount ROHS", Manufacturer="LIZ Elec", Manufacturer Part Number=CR0603FA84R5G, Supplier Part Number 1=C101216, ComponentLink1Description=LCSC, ComponentLink1URL=https://lcsc.com/product-detail/Chip-Resistor-Surface-Mount_LIZ-Elec-CR0603FA84R5G_C101216.html, Supplier 1=LCSC
R213: library part Res_100R_0603_1/10W, "RES SMD 100R OHM 5% 1/10W 0603", Manufacturer=FOJAN, Manufacturer Part Number="FRC0603J101 TS", Supplier Part Number 1=C2907089, ComponentLink1Description=LCSC, ComponentLink1URL=https://www.lcsc.com/product-detail/Chip-Resistor-Surface-Mount_FOJAN-FRC0603J101-TS_C2907089.html, Supplier 1=LCSC
R214 R215 R216: library part Res_1k_0603_1/10W, "RES SMD 1k OHM 5% 1/10W 0603", Manufacturer=FOJAN, Manufacturer Part Number="FRC0603J102 TS", Supplier Part Number 1=C2907113, ComponentLink1Description=LCSC, ComponentLink1URL=https://www.lcsc.com/product-detail/Chip-Resistor-Surface-Mount_FOJAN-FRC0603J102-TS_C2907113.html, ComponentLink2Description=Datashhet, ComponentLink2URL=https://www.lcsc.com/datasheet/C2907152.pdf, Supplier 1=LCSC
"SD-CARD 1": "CONN MICROSD CARD R/A SMD", Manufacturer=ATOM, Manufacturer Part Number=MR01A-01211, Supplier Part Number 1=C479742, ComponentLink1Description=LSCS, ComponentLink1URL=https://www.lcsc.com/product-detail/Card-Sockets-Connectors_ATOM-MR01A-01211_C479742.html, ComponentLink2Description=Datasheet, ComponentLink2URL=https://www.lcsc.com/datasheet/C479742.pdf, Supplier 1=LSCS
SW1 SW2: library part Sw_PUSH_4.5x4.5x5.0xmm, "SWITCH TACTILE SPST-NO 0.05A 12V", Manufacturer=BZCN, Manufacturer Part Number=TSC015A05026A, Supplier Part Number 1=C2888509, ComponentLink1Description=LCSC, ComponentLink1URL=https://www.lcsc.com/product-detail/Tactile-Switches_BZCN-TSC015A05026A_C2888509.html, Last modified by=N-A.Potosi, Last modified date=20190222, Supplier 1=LCSC
U1: library part "ESP32-S3-WROOM-1-N16R8  nnnnn", "ESP32-S3 Wi-Fi & Bluetooth 5 MCU module, 16MB Flash, 8MB PSRAM.", Manufacturer="Espressif Systems", Suplier  Part Number=5407-ESP32-S3-WROOM-1-N16R8TR-ND, ComponentLink1Description=DataSheep, ComponentLink1URL=https://documentation.espressif.com/esp32-s3-wroom-1_wroom-1u_datasheet_en.pdf, ComponentLink2Description=Digi-Key, ComponentLink2URL=https://www.digikey.com/en/products/detail/espressif-systems/ESP32-S3-WROOM-1-N16R8/16162642, Manufacturer product number=ESP32-S3-WROOM-1-N16R8, Supplier 1=Digi-Key
U100: library part SN65HVD230DR-CAN, "Transceiver Half CANbus 8-SOIC", Manufacturer="Texas Instruments", Manufacturer product number=SN65HVD230DR, Suplier  Part Number=296-11654-2-ND, ComponentLink1Description=DataSheep, ComponentLink1URL=https://www.ti.com/lit/ds/symlink/sn65hvd230.pdf?HQS=dis-dk-null-digikeymode-dsf-pf-null-wwe&ts=1793387216556&ref_url=https%253A%252F%252Fwww.ti.com%252Fgeneral%252Fdocs%252Fsuppproductinfo.tsp%253FdistId%253D10%2526gotoUrl%253Dhttps%253A%252F%252Fwww.ti.com%252Flit%252Fgpn%252Fsn65hvd230, ComponentLink2Description=Digi-Key, ComponentLink2URL=https://www.digikey.com/en/products/detail/texas-instruments/SN65HVD230DR/404367, Supplier 1=Digi-Key
U101: library part TVS_5.25V_2CH_SOT_23_6, "TVS DIODE 5.25V 17V SOT23-6", Manufacturer=STMicroelectronics, Supplier Part Number 1=C7519, ComponentLink1Description=LCSC, ComponentLink1URL=https://www.lcsc.com/product-detail/ESD-Protection-Devices_STMicroelectronics-USBLC6-2SC6_C7519.html, Manufacturer Part Number=USBLC6-2SC6, Supplier 1=LCSC
U102: "Switch de potencia con límite de corriente y control enable para corte en sleep de periféricos y MicroSD", Manufacturer="XI'AN Aerosemi Tech", Supplier Part Number 1=C89855, ComponentLink1Description=LCSC, ComponentLink1URL=https://www.lcsc.com/product-detail/C89855.html?s_z=n_q_MT9700%2520SOT-23-5, ComponentLink2Description=Datasheet, ComponentLink2URL=https://www.lcsc.com/datasheet/C89855.pdf, Manufacturer Part Number=MT9700, Supplier 1=LCSC
U200: library part "HOLTEK HT7033A-1_sensadoV", "Detector de tensión con umbral de 3.3V", Manufacturer=HOLTEK, Manufacturer product number=HT7033A-1, Suplier  Part Number=C73715, ComponentLink1Description=DataSheep, ComponentLink1URL=https://datasheet4u.com/download/529551/HT7033A-1.html, ComponentLink2Description=LCSC, ComponentLink2URL=https://www.lcsc.com/product-detail/C73715.html?s_z=n_q_p_HT7033A-1%2520SOT-23&spm=wm.ssy.bg.0.stp&lcsc_vid=RVlWUQFUEwdfUgVfRQdXU1JeFFlaBFcDFVVaX1BTQFUxVlNfRVhaXldRT1NYUTsOAxUeFF5JWBYZEEoKFBINSQcJGk4eFQsCAgIaSgADAwAHC0swGA0aBgMDWiULEwEFAw4cFDsoFg8EDgoBWiwHBBYJWi4AAkkjGwQNSikjRVleUCVVRCxdIDslRVJYUFFTWQkaCgg%3D, Supplier 1=LCSC
U201: library part LMR14006XDDCR, "IC REG BUCK ADJ 600MA SOT23", Manufacturer="Texas Instruments", Suplier  Part Number=296-44318-2-ND, ComponentLink1Description=DataSheep, ComponentLink1URL=https://www.ti.com/lit/ds/symlink/lmr14006.pdf?HQS=dis-dk-null-digikeymode-dsf-pf-null-wwe&ts=1794157197651, ComponentLink2Description=Digikey, ComponentLink2URL=https://www.digikey.com/en/products/detail/texas-instruments/LMR14006XDDCR/5176217?s=N4IgTCBcDaICoEkAEAZAsgJQIwBYAMeAbABoAipAwhiALoC%2BQA, Manufacturer product number=LMR14006XDDCR, Supplier 1=Digikey

## Free pads (board coordinates)
  round 60 hole 157.48 unplated: 0(1216.54,1245.48) 0(1279.53,3543.31) 0(4110.24,3570.87)

## Via types
v1: diameter 18, hole 12, Top Layer to Bottom Layer, tented both sides, 162 vias
v2: diameter 22, hole 12, Top Layer to Bottom Layer, tented both sides, 8 vias
v3: diameter 36, hole 30, Top Layer to Bottom Layer, tented both sides, 7 vias
v4: diameter 36, hole 20, Top Layer to Bottom Layer, tented both sides, 2 vias
v5: diameter 37, hole 30, Top Layer to Bottom Layer, tented both sides, 1 vias

## Nets (pads, with @x,y where several pads share a name; then routed paths per layer and width w, separated by ;. In a path a pad name is that pad's centre, name@x,y a point inside that pad or via, vN(x,y) a via of type N, cw(c..) or ccw(c..) an arc to the next point about the centre after c; other vN are vias at no path point)
3.3_SWITCHED: 4.3 C102.1 U102.1 | length 1524.5
  Top Layer w20: 4.3@2768.9,2007.87 2820.08,2059.06 3065.78,2059.06 3083.66,2076.93 3083.66,2093.5 3051.18,2125.98 3051.18,2231.75 3053.4,2233.97 3053.4,2277.84 3037.69,2293.56 3026.77,2293.56 2968.25,2352.08 2968.25,2395.95 2996.35,2424.05 3054,2424.05 3103.51,2473.56 v2(3103.51,2501.51) ; v2(2978.4,2531.5) 2904.92,2531.5 2892.64,2543.77 2879.34,2543.77 2867.07,2556.05 2867.07,2684.11 2891.62,2708.66 2952.85,2708.66 2964.57,2696.95 C102.1@2964.57,2657.48 3023.62,2657.48 3025.59,2655.51 U102.1@3035.43,2655.51
  Bottom Layer w20: v2(2978.4,2531.5) 3073.52,2531.5 v2(3103.51,2501.51)
3V3: 2.1 3.2 5.1 6.2 "SD-CARD 1.4" C2.1 C3.1 C5.2 C101.2 C103.1 C201.1 C202.1 C203.1 D205.1 D206.4 D206.5 D206.6 L200.2 R1.2 R2.2 R3.2 R203.2 U1.2 U100.3 U102.5 | length 10281.6
  Top Layer w20: 2106.3,1807.09 2109.82,1810.6 ; 2130.8,1810.6 2131,1810.8 2131,1863.72 2130.8,1863.91 v5(2130.8,1871.57) ; 2.1@2154.33,1988.19 2154.33,1984.81 2187.78,1951.36 2187.78,1931.78 2251.15,1868.41 v3(2256.35,1868.41)
  Top Layer w30: C5.2@1913.57,1774.6 1913.57,1828.24 1911.73,1830.09 ; R2.2@2087.74,1788.53 2104.33,1771.93 2104.33,1686.03 ; 2106.3,1807.09 2083.3,1830.09 1911.73,1830.09 ; 3.2@2437.01,3195.67 2669.29,3195.67 ; U100.3@2560.23,2380.71 2560.82,2381.31 2656.89,2381.31 C101.2@2657.48,2381.9 C101.2@2655.98,2381.9 ; 5.1@2862.2,2493.7 2792.15,2493.7 2781.11,2482.67 ; U102.5@3137.8,2655.51 3134.33,2655.51 3050.18,2739.66 2845.96,2739.66 2779.53,2673.23 2779.53,2484.25 2781.11,2482.67 ; U102.5@3144.45,2657.48 C103.1@3226.85,2657.48 ; C203.1@3153.27,3428.22 C202.1@3093.27,3428.22 C201.1@3033.27,3428.22 3032.11,3427.06 3032.11,3261.59 L200.2@3030.94,3260.43 3024.07,3267.3 2952.34,3267.3 2880.71,3195.67 2669.29,3195.67 ; C103.1@3223.35,2660.98 3223.35,2793.3 3252.34,2822.29 3277.19,2822.29 3278.27,2821.22 3294.77,2821.22 3298.27,2817.72 R203.2@3298.27,2816.22 ; C103.1@3228.35,2657.48 3231.85,2653.98 3259.4,2653.98 3281.94,2631.45 3281.94,2492.32 3404.18,2370.08 v3(3456.69,2370.08) ; U1.2@3336.61,1216.93 3010.11,1216.93 2942.78,1149.61 2737.54,1149.61 2712.14,1124.21 1857.12,1124.21 1728.35,1252.99 1728.35,1841.9 ; U1.2@3354.33,1216.54 3396.03,1216.54 3431.49,1251.99 3481.76,1251.99 C2.1@3486,1256.24 ; C2.1@3486,1251 3729.81,1251 3739.09,1260.28 3740.59,1260.28 3744.09,1263.78 ; v3(3559.06,2326.77) 3769.9,2326.77 3865.99,2230.68 R1.2@3865.99,2102.48 ; 3756.62,1252.76 6.2@3885.83,1252.76 4315.05,1252.76 4356.95,1294.66 4356.95,1330.04 4372.71,1345.8 4654.2,1345.8 4696.24,1303.76 4785.58,1303.76 4803.15,1286.18 D206.5@4803.15,1240.16 ; 1728.35,1841.9 1740.16,1830.09 1911.73,1830.09 ; 1728.35,1841.9 1728.35,2381.04 1839.43,2492.13 2574.8,2492.13 ; 2574.8,2492.13 2562.99,2503.94 2562.99,2700.79 2678.39,2816.18 2682.32,2816.18 2692.91,2826.77 D205.1@2692.91,2830.71 2692.91,2912.19 2669.29,2935.81 2669.29,3195.67 ; 2574.8,2492.13 2622.05,2444.88 2743.33,2444.88 2781.11,2482.67
  Bottom Layer w20: v5(2130.8,1871.57) 2132.56,1869.82 2198.35,1869.82 2199.75,1868.41 v3(2256.35,1868.41)
  Bottom Layer w30: v3(3456.69,2370.08) 3500,2326.77 v3(3559.06,2326.77)
BLUE_LED: R214.1 R217.1 U1.18 | length 4257.5
  Top Layer w10: U1.18@3117.13,1866.14 3117.41,1866.43 3117.41,1920.56 3271.14,2074.29 3289.73,2074.29 3334.84,2119.41 3334.84,2181.03 3606.03,2452.22 3829.37,2452.22 3851.47,2474.32 4074.8,2474.32 4410.83,2138.29 4568.2,2138.29 4592.31,2114.17 4681.1,2114.17 4797.21,2230.28 4797.21,2323.71 4807.65,2334.15 4853.77,2334.15 4876.95,2310.97 4876.95,2068.47 4900.13,2045.29 4900.13,1594.05 4884.13,1578.05 4884.13,1272.64 4885.27,1271.5 4885.27,1184.48 4814.04,1113.25 4304.74,1113.25 4273.74,1144.25 R214.1@4272.24,1144.25 R217.1@4347.04,1144.25
BOOT: C4.2 SW2.1 U1.27 | length 2087.3
  Top Layer w10: v2(2622.05,1929.13) 2624.34,1931.43 2624.34,1954.68 2613.78,1965.24 2613.78,2105.91 2681.1,2173.23 2681.1,2222.65 2669.31,2234.44 2547.2,2234.44 2516.48,2265.16 2516.48,2296.27 2522.92,2302.71 2597.54,2302.71 2603.98,2296.27 2603.98,2293.77 2629.12,2268.63 2680.37,2268.63 2742.11,2206.9 2784.05,2206.9 2818.07,2172.87 2818.07,2137.27 2845.3,2110.04 2900.37,2110.04 3010.83,2220.5 SW2.1@3010.83,2255.91 3003.93,2262.8 3003.93,2286.7 2947.25,2343.38 2947.25,2404.65 3066.1,2523.51 3112.62,2523.51 3154.9,2481.23 3154.9,2300.58 3199.57,2255.91 SW2.1@3241.14,2255.91 ; v2(2622.53,1857.32) 2622.53,1831.5 2623.11,1830.93 2623.11,1825.65 2631.83,1816.93 U1.27@2647.64,1816.93
  Bottom Layer w10: v2(2622.05,1929.13) 2622.29,1928.89 2622.29,1857.57 v2(2622.53,1857.32)
CAN_H: 100.1 J1.1 U100.7 | length 593.4
  Top Layer w15: J1.1@1808.9,2173.23 2003.94,2173.23 2044.49,2213.78 100.1@2117.43,2213.78 ; 100.1@2118.11,2213.78 2199.05,2213.78 2315.98,2330.71 U100.7@2337.73,2330.71
CAN_L: J1.2 R101.2 U100.6 | length 528.2
  Top Layer w15: J1.2@1822.53,2378.71 R101.2@2228.98,2378.71 2229.98,2379.71 2336.73,2379.71 U100.6@2337.73,2380.71
  Top Layer w30: J1.2@1813.9,2370.08 J1.2@1822.53,2378.71